# Altium PCB main.PcbDoc (part 2 of 3)
Units mm, origin at the board's own origin, x right, y up, seen from the top; angles counter-clockwise.
Board outline 200 x 85 mm, 2 copper layers (Top Layer, Bottom Layer); 362 components, 202 nets, 1059 pads, 878 vias.
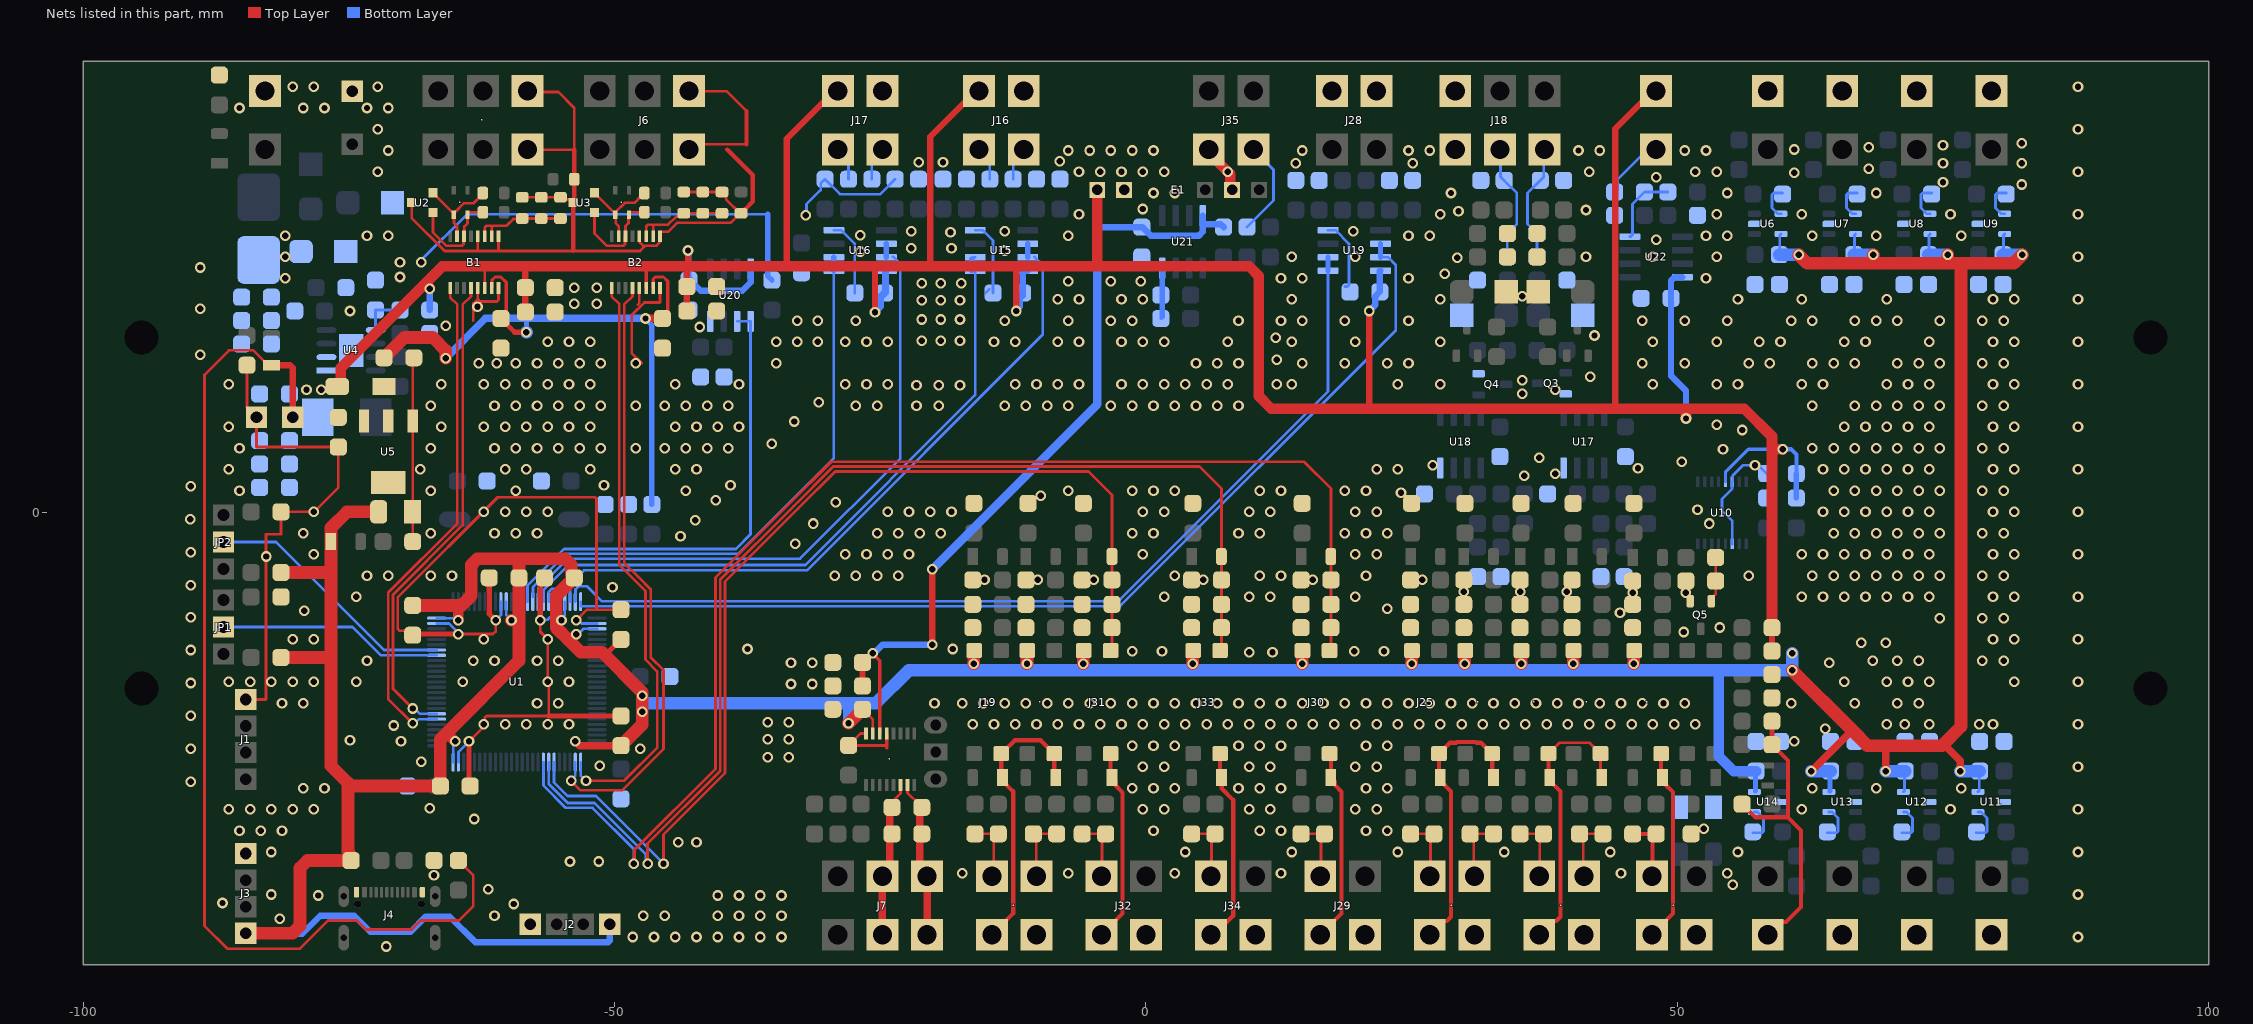
[diagram p2: the nets of this part, all layers, seen from the top]

## Part data
. . . . . . D17 D24 D26 D28: library part LED_SMD_1206_RED, "LED, SMD, 1206, RED", ASSEMBLY=ASSEMBLY, DESC=DESCRIPTION, MANF=MANF, MANF_P#=MANF_PART#, MountType=SMT, PARAM2=1.7~2.4V, PartType=LED, PRICE=36t@Javan
. D2 D3 D6 D13 D15 D18 D19 D23 D25 D27 D29 D30 D34: library part LED_SMD_1206_GRN, "LED, SMD, 1206, GREEN", ASSEMBLY=ASSEMBLY, DESC=DESCRIPTION, MANF=-, MANF_P#=-, MountType=SMT, PARAM=20mA, PARAM2=2.2V, PartType=LED, PRICE=36t@Javan
. . . . . . . . . . . . . . . . . . . . . . . . . . . . . . . . . . . . . . F1 F2 F3 F4 F5 F6 F7 F8 R1 R2 R3 R4 R5 R6 R7 R12 R13 R14 R15 R16 R17 R19 R20 R21 R22 R23 R24 R25 R26 R27 R28 R29 R32 R33 R36 R37 R40 R41 R42 R44 R45 R47 R48 R49 R50 R51 R52 R53 R54 R55 R56 R57 R58 R59 R60 R61 R63 R64 R65 R66 R71 R74 R78 R79 R80 R81 R90 R91 R94 R96 R97 R99 R100 R101 R102 R105 R106 R107 R109 R110 R111 R112 R113 R114 R115 R116 R117 R118 R119 R120 R121 R122 R123 R124 R125 R126 R127 R128 R129 R134: library part RES_SMD_1206, "RESISTOR, SMD", ASSEMBLY=ASSEMBLY, DESC=DESCRIPTION, DIST#=MOUSER, MANF=-, MANF_P#=-, PARAM="1%, 0.25W", PARAM2=-, PRICE=-
. . . . . . J19 J25 J30 J31 J33: "Optoisolator Transistor Output 5000Vrms 1 Channel 4-SMD", PACKAGE="SMD-4 Everlight Electronics Co Ltd", Check_prices=https://www.snapeda.com/parts/EL817S/Everlight+Electronics+Co+Ltd/view-part/?ref=eda, MF="Everlight Electronics", MP=EL817S, SnapEDA_Link=https://www.snapeda.com/parts/EL817S/Everlight+Electronics+Co+Ltd/view-part/?ref=snap
. . . . J16 J17 J28 J29 J32 J34 J35: "CONN, ATX POWER, 4 P", PACKAGE=ATXPWR-4pin, MANF="TE, Molex", MANF_P#="4-1775099-0, 39281043", MountType=THD, Part Type=Conn.
. . . . . . . . . . . C1 C2 C3 C4 C5 C6 C7 C8 C9 C10 C11 C12 C13 C15 C16 C17 C22 C23 C24 C29 C30 C31 C32 C33 C34 C35 C36 C37 C39 C41 C42 C43 C46 C47 C48 C49 C50 C51 C52 C53 C54 C55 C56 C57 C58 C59 C60 C61 C62 C63 C64 C65 C66 C69 C70 C72 C73 C74 C75 C76 C77 C78 C79 C80 C81 C82 C83 C84 C87 C90 C92 C93 C94 C95 C96 C97 C98 C99 C100 C101 CY1: library part CAP_SMD_MLCC_1206, "CAP, MLCC", ASSEMBLY=ASSEMBLY, MANF=-, MANF_P#=MANF_PART#, PARAM="-, -%", PARAM2=-V, PRICE="100= 1$"
. C18 C19 C20 C21 C25 C26 C27: library part CAP_SMD_MLCC_0805, "CAP, MLCC", ASSEMBLY=ASSEMBLY, MANF=-, MANF_P#=MANF_PART#, PARAM="-, -%", PARAM2=-V, PRICE="100= 1$"
. .: library part CMP-08256-000009-1, "CMC 200MA 2LN 1KOHM SMD", Case/Package=1008, Current=200mA, DC Resistance (DCR)=900mR, Max Operating Temperature=85°C, Min Operating Temperature=-40°C, Package Quantity=1, Test Frequency=100MHz, Voltage Rating=20V, DC Current=200mA, Depth=2.2mm, Height=0.051inch, Impedance=1kR, Lead Free="Lead Free", Length=0.098inch, Max DC Current=200mA, Mount="Surface Mount", Number of Lines=2, Packaging="Tape and Reel", Series=ACM, Termination=SMD/SMT, Width=0.079inch
. . . .: library part RES_SMD_0805, "RESISTOR, SMD", ASSEMBLY=ASSEMBLY, DESC=DESCRIPTION, DIST#=MOUSER, MANF=-, MANF_P#=-, PARAM=-W, PARAM2=1%, PRICE="100= 0.5$"
.: "LGA-16(4.7x5.2) Isolated RS485 Transceivers (with Power) ROHS", Manufacturer_Name=ChipAnalog, Datasheet Link=https://e.chipanalog.com/Public/Uploads/uploadfile/files/20250325/CAIS2062AdatasheetVersion1.01en20250325.pdf, Geometry.Height=1.09mm, Manufacturer_Part_Number=CA-IS2092A
. J6 J7 J18: "CONN, ATX POWER, 6 P", PACKAGE=ATXPWR-6pin, MANF=TE, MANF_P#=4-1775099-1, MountType=THD, Part Type=Conn.
.: library part DIODE_SMD_SCHOTTKY_SS34, "DIODE,TVS, 24V, 15A", ASSEMBLY=ASSEMBLY, DESC=DESCRIPTION, MANF=VISHAY, MANF_P#=SS34, PARAM=20V, PARAM2=3A, PRICE=PRICE
B1 B2: "LGA-16(4.7x5.2) Isolated CAN Transceivers (with Power) ROHS", Manufacturer_Name=ChipAnalog, Datasheet Link=https://e.chipanalog.com/Public/Uploads/uploadfile/files/20250325/CAIS2062AdatasheetVersion1.01en20250325.pdf, Geometry.Height=1.09mm, Manufacturer_Part_Number=CA-IS2062A
C28: library part CAP_THD_EL_470uF_35v, "CAP, THD, ELEC,", ASSEMBLY=ASSEMBLY, DESC=DESCRIPTION, DIST#=MOUSER, MANF=MANF, MANF_P#=MANF_PART#, PARAM=20%, PARAM2=35v, PRICE="10= -$"
C38: library part CAP_THD_EL_100uF_50v, "CAP, THD, ELEC,", ASSEMBLY=ASSEMBLY, DESC=DESCRIPTION, DIST#=MOUSER, MANF=MANF, MANF_P#=MANF_PART#, PARAM=20%, PARAM2=50v, PRICE="10= -$"
C40: library part CAP_SMD_TAN, "CAP, SMD, TAN", MANF=VISHAY, MANF_P#=T55A106M6R3C0300, PARAM="20%, 300mOhm, -55~105oC", PARAM2=6.3V, PRICE=0.46$
D1 D4 D8 D9 D10 D11: library part DIODE_SMD_SCHOTTKY_SS34, "DIODE, SCHOTTKY, 20V, 3A", ASSEMBLY=ASSEMBLY, DESC=DESCRIPTION, MANF=VISHAY, PARAM=20V, PARAM2=3A, PRICE=PRICE
  D4 D8 D9: MANF_P#=SS34
D7: library part DIODE_SMD_SCHOTTKY_B345A, "DIODE, SCHOTTKY, 40V, 3A", ASSEMBLY=ASSEMBLY, DESC=DESCRIPTION, MANF=DIODES, MANF_P#=B345AE-13, PARAM="3A, -50~150oC", PARAM2="45Vrrm, 0.45Vf", PRICE=0.35$
D31 D32: library part DIODE_SMD_1N4001, "DIODE, GENERAL PURPOSE, 50V/1A", ASSEMBLY=ASSEMBLY, DESC=DESCRIPTION, MANF=MANF, MANF_P#=1N4001, PARAM="50V VRRM", PARAM2=1A, PRICE=PRICE
E1: library part a0505s-?
FH1: library part FUSE_SMD_HOLDER_24101812, "Fuse SMD2410 Holder", PACKAGE=SMD,5.0x9.7mm, MANF=Littelfuse, MANF_P#=01550900M, PARAM="max. 10A", PARAM2=125v, PRICE=0.2$
FUSE_SMD1: library part RES_SMD_1206, "resetable fuse", ASSEMBLY=ASSEMBLY, DESC=DESCRIPTION, DIST#=MOUSER, MANF=-, MANF_P#=-, PARAM="1%, 0.25W", PARAM2=-, PRICE=-
J1 J2 J3: "PW10-x-M, JST-BxB-XH-A pitch: 2.5mm, 3A/250v", MANF=JST, MANF_P#=B4B-XH-A, PARAM=3.0A, PARAM2=250v
J4: library part CONN_USBC_SMD_16_DX07S016JA1, "CONN, USB, Type C, USB 2.0, Right-Angle, SMD", MANF=JAE, MANF_P#=DX07S016JA1R1500, PARAM=5A, PRICE=1.5$
J8 J9 J10 J11 J12 J13 J14 J15 J36 POWER1: "CONN, ATX POWER, 2 P", PACKAGE=ATXPWR-2pin, MANF=Molex, MANF_P#=39281023, MountType=THD, Part Type=Conn.
JP1 JP2 JP3: library part JUMPER_HDR_3P, "JUMPER, HEADER 3PIN", MANF=MANF, MANF_P#=MANF_P#
L3: library part AMPLA7050S-100MT, "Inductor Power Shielded/Molded Wirewound 10uH 20% 100KHz Carbonyl Powder 4A 0.069Ohm DCR T/R", PACKAGE=Package, Availability="In Stock", Check_prices=https://www.snapeda.com/parts/AMPLA7050S-100MT/Abracon/view-part/?ref=eda, MF="Abracon Corporation", MP=AMPLA7050S-100MT, PRICE=None, Purchase-URL=https://pricing.snapeda.com/search/part/AMPLA7050S-100MT/?ref=eda, SnapEDA_Link=https://www.snapeda.com/parts/AMPLA7050S-100MT/Abracon/view-part/?ref=snap
Q1 Q2 Q3 Q4: library part NPN_MMBT8050_SOT23, "BJT, NPN, 25v, 1.5A, SMD, SOT23", PACKAGE=SOT-23, MANF=GALAXY, MANF_P#=MMBT8050, PARAM="25v, 1.5A", PARAM2=300mW, PRICE=0.09t@JAVAN
Q5: library part MOSN_2N7002_SOT23, "MOSFET, N-CH, 60V, 0.3A", ASSEMBLY=ASSEMBLY, MANF=NXP, MANF_P#=2N7002, PARAM=0.3A, PARAM2=60v, PRICE=0.3t@Javan
RAMON1 RAMON2: library part RamonLogo
U1: "ARM Cortex-M4 32-bit MCU+FPU, 210 DMIPS, 1024 kB Flash, 192 kB Internal RAM, 82 I/Os, 100-pin LQFP, -40 to 85 degC, Tray", I/Os (High Current)=82, Manufacturer=STMicroelectronics, Operating Frequency(F) (Processor speed) (MHz)=168, Supplier Part Number 1=497-11605-ND, Supply Voltage(Vcc) max (V)=3.6, Supply Voltage(Vcc) min (V)=1.8, ComponentLink1Description="Manufacturer URL", ComponentLink1URL=http://www.st.com/web/en/home.html, ComponentLink2Description=Datasheet, ComponentLink2URL=http://www.st.com/st-web-ui/static/active/en/resource/technical/document/datasheet/DM00037051.pdf, ComponentLink3Description="Package Specification", ComponentLink3URL=http://www.st.com/st-web-ui/static/active/en/resource/technical/document/data_brief/DM00071938.pdf, Core="ARM Cortex-M4", D/A Converter=2x12-bit, DatasheetVersion="Rev. 4", FLASH Size (Prog) (kB)=1024, Internal RAM Size (kB)=192, Mounting Technology="Surface Mount", PackageDescription="100-Pin Low Profile Quad Flat Package, 14 x 14 mm Body, 0.5 mm Pitch", PackageReference=LQFP100, PackageVersion="Rev. 1, 06/2013", Packing=Tray, PartNumber=STM32F407VGT6, Supplier 1=Digi-Key, Supplier 2=Farnell, Supplier 3=Newark, Supplier 4=Mouser, Supplier Part Number 2=2064368, Supplier Part Number 3=73T2333, Supplier Part Number 4=511-STM32F407VGT6
U2 U3: library part CMP-2000-07553-1, "TVS Array - Asymmetrical Data Line Protector, 600 W, 7.5 V, -55 to 150 degC, 3-Pin SOT23, RoHS, Tape and Reel", Capacitance=75pF, Case\/Package=SOT-23, Clamping Voltage=17V, Current=20uA, Manufacturer="Protek Devices", Max Operating Temperature=150degC, Min Breakdown Voltage=7.5V, Min Operating Temperature=-55degC, Package Description="3-Pin Small Outline Transistor, Body 2.92 x 1.3 mm, Pitch 0.94 mm", Package Reference=SOT23-3, Power Dissipation=600W, Voltage=12V, Working Voltage=7V, Datasheet URL=www.protekdevices.com/xyz/documents/datasheets/psm712.pdf, Datasheet Version=10/2013, Depth=1.4mm, Direction=Bidirectional, Element Configuration=Dual, Lead Free=LeadFree, Leakage Current=20uA, Length=3.04mm, Manufacturer URL=http://www.protekdevices.com/, Mounting Technology=SurfaceMount, Number of Pins=3, Packaging=TapeandReel, Radiation Hardening=No, RoHSCompliant=True
U4: library part CMP-04918-000184-1, "IC REG BUCK ADJUSTABLE 3A 8SOPWR", Max Input Voltage=36V, Max Operating Temperature=125°C, Max Output Voltage=24V, Min Input Voltage=3.8V, Min Operating Temperature=-40°C, Min Output Voltage=1V, Output Current=3A, Switching Frequency=400kHz, Mount="Surface Mount", Number of Outputs=1, Number of Pins=8, Output Configuration=Positive, Output Type=Adjustable, Packaging="Cut Tape", RoHS Compliant=Yes, Synchronous Rectifier=Yes
U5: "1-A 16-V high-PSRR linear voltage regulator", PACKAGE="SOT-223-4 Texas Instruments", Check_prices=https://www.snapeda.com/parts/TLV76133DCYR/Texas+Instruments/view-part/?ref=eda, MF="Texas Instruments", MP=TLV76133DCYR, SnapEDA_Link=https://www.snapeda.com/parts/TLV76133DCYR/Texas+Instruments/view-part/?ref=snap
U6 U7 U8 U9 U11 U12 U13 U14: "26V, 350kHz current sense amplifier", PACKAGE="SOT-23-5 Texas Instruments", Check_prices=https://www.snapeda.com/parts/INA180A1IDBVR/Texas+Instruments/view-part/?ref=eda, MF="Texas Instruments", MP=INA180A1IDBVR, SnapEDA_Link=https://www.snapeda.com/parts/INA180A1IDBVR/Texas+Instruments/view-part/?ref=snap
U10: "1 Circuit IC Switch 8:1 4.5Ohm 16-TSSOP", PACKAGE="TSSOP-16 Analog Devices", Availability=Good, Check_prices=https://www.snapeda.com/parts/ADG708BRUZ-REEL7/Analog%20Devices%20Inc./view-part/1237689/?ref=eda, MF="Analog Devices", MP=ADG708BRUZ-REEL7, PRICE=None, Purchase-URL=https://pricing.snapeda.com/search/part/ADG708BRUZ-REEL7/?ref=eda, SnapEDA_Link=https://www.snapeda.com/parts/ADG708BRUZ-REEL7/Analog%20Devices%20Inc./view-part/1237689/?ref=snap
U15 U16 U19 U20 U21 U22: "Dual, 36-V, 1.2-MHz, 2-mV offset voltage operational amplifier", PACKAGE="SOIC-8 Texas Instruments", Check_prices=https://www.snapeda.com/parts/LM358BAIDR/Texas+Instruments/view-part/?ref=eda, MF="Texas Instruments", MP=LM358BAIDR, SnapEDA_Link=https://www.snapeda.com/parts/LM358BAIDR/Texas+Instruments/view-part/?ref=snap
U17 U18: library part LM358BAIDR, "Dual, 36-V, 1.2-MHz, 2-mV offset voltage operational amplifier", PACKAGE="SOIC-8 Texas Instruments", Check_prices=https://www.snapeda.com/parts/LM358BAIDR/Texas+Instruments/view-part/?ref=eda, MF="Texas Instruments", MP=LM358BAIDR, SnapEDA_Link=https://www.snapeda.com/parts/LM358BAIDR/Texas+Instruments/view-part/?ref=snap
U23: "P-Channel 100 V 600mA (Ta) 625mW (Ta) Surface Mount SOT-23-3", PACKAGE="SOT-23-3 Diodes Inc.", Availability="In Stock", Check_prices=https://www.snapeda.com/parts/ZXMP10A13FTA/Diodes+Inc./view-part/?ref=eda, MF="Diodes Inc.", MP=ZXMP10A13FTA, PRICE=None, Purchase-URL=https://pricing.snapeda.com/search/part/ZXMP10A13FTA/?ref=eda, SnapEDA_Link=https://www.snapeda.com/parts/ZXMP10A13FTA/Diodes+Inc./view-part/?ref=snap
X1: library part XTL_2_HC49_8MHz_SMD, "Crystal MOST POPULAR ABL HC49 PACKAGE", MANF=ABRACON, MANF_P#=ABLS-8.000MHZ-B4-T, PARAM="8MHz, 18pF, 30PPM, -20~70oC", PRICE=0.3$

## Free pads (board coordinates)
  round 3 hole 3.2: 3(-94.5,16.5) 3(94.5,16.5) 4(-94.5,-16.5) 4(94.5,-16.5)

## Via types
v1: diameter 1, hole 0.6, Top Layer to Bottom Layer, tented both sides, 876 vias
v2: diameter 1, hole 0.6, Top Layer to Bottom Layer, 2 vias

## Nets (pads, with @x,y where several pads share a name; then routed paths per layer and width w, separated by ;. In a path a pad name is that pad's centre, name@x,y a point inside that pad or via, vN(x,y) a via of type N, cw(c..) or ccw(c..) an arc to the next point about the centre after c; other vN are vias at no path point)
3v3MCU: ..4@30.03,-12.95 ..4@35.33,-12.95 ..4@40.23,-12.95 ..4@45.93,-12.95 ..4@-11.17,-12.95 ..7 B1.7 B2.7 C8.2 C9.2 C10.2 C11.2 C12.2 C13.2 C17.1 C24.1 C40.1 C41.1 C48.1 C49.2 C50.2 C53.2 C54.2 C58.2 C59.2 C62.2 C63.2 D6.1 D7.1 J2.1 J3.1 J19.4 J25.4 J30.4 J31.4 J33.4 R2.2 R4.2 R5.1 R6.2 U1.11 U1.19 U1.21 U1.22 U1.28 U1.50 U1.75 U1.100 U5.2 U5.4 U6.5 U7.5 U8.5 U9.5 U11.5 U12.5 U13.5 U14.5 | length 545
  Top Layer w0.254: B1.7@-61.575,21.175 B1.7@-61.553,21.197 ; C17.1@-60.7,18.3 C17.1@-60.2,18.8 ; C24.1@-45.5,18.3 C24.1@-45,18.8 ; C48.1@-26.675,-18.475 -25.7,-19.45 ..7@-25.7,-20.75
  Top Layer w0.3: B1.7@-61.553,21.197 -61.553,21.908 -61.261,22.2 -60.7,22.2 -60.2,21.7 C17.1@-60.2,18.8 ; B2.7@-46.375,21.175 -46.375,22.009 -46.184,22.2 -45.4,22.2 -45,21.8 C24.1@-45,18.8
  Top Layer w0.5: C17.1@-60.7,18.3 -59.4,17 v1(-58.3,17) ; -51.2,-13.1 -50.6,-13.1 C11.2@-49.4,-11.9 ; 66.4,-20.5 66.5,-20.5 ; 69.614,-21.986 69.7,-21.9 ; 74.9,-21.9 75.2,-21.9
  Top Layer w0.7: v1(-53.7,-21.5) -53.3,-21.9 C8.2@-49.4,-21.9 ; v1(-47.1,18.3) C24.1@-45.5,18.3 ; v1(62.6,-24.3) 66.4,-20.5 ; v1(69.614,-24.3) 69.614,-21.986 ; 75.2,-21.9 76.629,-23.329 v1(76.629,-24.3)
  Top Layer w1: -65.8,-20.7 v1(-65,-21.5) ; v1(-64.7,-10.1) -64.7,-9 -64.4,-8.7 ; -54.35,-11.95 -54.15,-11.95 v1(-53.6,-11.4)
  Top Layer w1.2: J3.1@-84.7,-39.55 -80.303,-39.55 -79.6,-38.847 -79.6,-33.403 -78.897,-32.7 R5.1@-74.8,-32.7 -75,-32.5 -75,-31.983 -75.1,-31.883 -75.1,-25.4 ; R2.2@-81.4,-13.6 -76.7,-13.6 ; R6.2@-81.4,-5.6 -76.849,-5.6 -76.7,-5.451 ; C40.1@-72.2,0.1 -75.2,0.1 -76.7,-1.4 D6.1@-76.7,-2.7 -76.7,-5.451 ; C41.1@-71.7,14.6 -69.8,16.5 -67.1,16.5 -65.9,15.3 v1(-65.9,14.558) ; C9.2@-69,-8.7 -64.4,-8.7 -63.5,-7.8 -63.5,-4.886 -62.914,-4.3 -59,-4.3 ; v1(-59.7,-10.1) -59,-10.1 ; C8.2@-49.4,-21.9 -47.4,-19.9 v1(-47.4,-18.7) v1(-47.4,-17.2) -47.4,-16.9 -51.2,-13.1 -53.2,-13.1 -54.35,-11.95 -55.5,-10.8 -55.5,-7.8 C10.2@-53.8,-6.1 -54.073,-5.827 -54.073,-4.886 -54.659,-4.3 -59,-4.3 ; v1(-28,-19.8) -26.875,-18.675 C48.1@-26.675,-18.475 ; v1(-16.2,-14.2) -16.2,-12.98 J19.4@-16.17,-12.95 ; v1(-11.2,-14.2) -11.2,-12.98 ..4@-11.17,-12.95 ; v1(-5.9,-14.2) -5.9,-12.98 J31.4@-5.87,-12.95 ; v1(4.4,-14.2) 4.4,-12.98 J33.4@4.43,-12.95 ; v1(14.7,-14.2) 14.7,-12.98 J30.4@14.73,-12.95 ; v1(25,-14.2) 25,-12.98 J25.4@25.03,-12.95 ; v1(30,-14.2) 30,-12.98 ..4@30.03,-12.95 ; v1(35.3,-14.2) 35.3,-12.98 ..4@35.33,-12.95 ; v1(40.2,-14.2) 40.2,-12.98 ..4@40.23,-12.95 ; v1(45.9,-14.2) 45.9,-12.98 ..4@45.93,-12.95 ; v1(60.8,-14.8) 66.5,-20.5 67.9,-21.9 69.7,-21.9 74.9,-21.9 76.7,-20.1 76.7,23.5 ; v1(61.414,24.3) 62.214,23.5 68.429,23.5 ; v1(68.429,24.3) 68.429,23.5 ; v1(75.443,24.3) 75.443,23.5 ; v1(82.457,24.3) 81.657,23.5 76.7,23.5 ; -76.7,-13.6 -76.7,-5.451 ; -76.7,-13.6 -76.7,-23.8 -75.1,-25.4 ; -75.1,-25.4 -74.8,-25.7 C12.2@-66.4,-25.7 -66.4,-21.3 -65.8,-20.7 -59,-13.9 -59,-10.1 ; -59,-10.1 -59,-9.4 C13.2@-59,-6.1 -59,-4.3 ; 68.429,23.5 75.443,23.5 ; 75.443,23.5 76.7,23.5
  Bottom Layer w0.254: U1.100@-66.75,-9.9 -65.102,-9.9 -64.902,-10.1 v1(-64.7,-10.1) ; U1.75@-65.2,-23.45 -65.2,-21.902 -65,-21.702 v1(-65,-21.5) ; U1.11@-60.2,-8.35 -60.2,-9.6 v1(-59.7,-10.1) ; U1.19@-56.2,-8.35 -56.191,-8.341 -56.191,-7.417 -55.898,-7.123 -55.502,-7.123 -55.209,-7.417 -55.209,-8.341 U1.21@-55.2,-8.35 -55.2,-9.698 -55,-9.898 v1@-55,-9.907 ; v1(-55,-10.1) v1@-55,-9.907 ; U1.22@-54.7,-8.35 -54.7,-9.607 v1@-55,-9.907 ; v1(-53.7,-21.5) -53.498,-21.5 -53.098,-21.9 U1.50@-51.65,-21.9 ; v1(-53.6,-11.4) -53.431,-11.4 -52.931,-10.9 U1.28@-51.65,-10.9 ; U14.5@57.245,-26.25 U14.5@57.351,-26.144 ; C63.2@57.351,-24.349 C63.2@57.4,-24.3 ; C49.2@59.6,24.3 59.649,24.349 59.649,26.144 U6.5@59.755,26.25 ; U13.5@64.259,-26.25 U13.5@64.366,-26.144 ; C62.2@64.366,-24.349 C62.2@64.414,-24.3 ; C50.2@66.614,24.3 66.663,24.349 66.663,26.144 U7.5@66.769,26.25 ; U12.5@71.274,-26.25 71.38,-26.144 C59.2@71.38,-24.349 ; C53.2@73.629,24.3 73.677,24.349 73.677,26.144 U8.5@73.784,26.25 ; U11.5@78.288,-26.25 78.394,-26.144 78.394,-24.349 C58.2@78.443,-24.3 ; C54.2@80.643,24.3 80.692,24.349 80.692,26.144 U9.5@80.798,26.25
  Bottom Layer w0.5: v1(-58.3,17) -58.3,18.3 ; v1(-47.1,18.3) -47.1,18.257 -46.5,17.657 R4.2@-46.5,0.8 ; U14.5@57.351,-26.144 C63.2@57.351,-24.349 ; U13.5@64.366,-26.144 C62.2@64.366,-24.349
  Bottom Layer w0.6: J3.1@-84.7,-39.55 -84.65,-39.6 -79.4,-39.6 -77.7,-37.9 -74.5,-37.9 -73,-39.4 -69.2,-39.4 -67.8,-38 -65.5,-38 -63.1,-40.4 -50.6,-40.4 -50.45,-40.25 J2.1@-50.45,-38.7
  Bottom Layer w0.7: v1(-65.9,14.558) -62.158,18.3 -58.3,18.3 v1@-47.154,18.3
  Bottom Layer w1: v1(-47.4,-18.7) -47.4,-17.9 v1(-47.4,-17.2) ; v1(-28,-19.8) -28,-17.9 ; 53.908,-14.8 53.908,-22.908 55.3,-24.3 C63.2@57.4,-24.3
  Bottom Layer w1.2: -47.4,-17.9 -28,-17.9 -25.4,-17.9 -22.3,-14.8 -16.2,-14.8 ; v1(-16.2,-14.2) -16.2,-14.8 ; v1(-11.2,-14.2) -11.2,-14.8 ; v1(-5.9,-14.2) -5.9,-14.8 ; v1(4.4,-14.2) 4.4,-14.8 ; v1(14.7,-14.2) 14.7,-14.8 ; v1(25,-14.2) 25,-14.65 25.15,-14.8 ; v1(30,-14.2) 30,-14.8 ; v1(35.3,-14.2) 35.3,-14.8 ; v1(40.2,-14.2) 40.2,-14.8 ; v1(45.9,-14.2) 45.9,-14.8 ; C49.2@59.6,24.3 v1(61.414,24.3) ; v1(60.8,-13.2) v1(60.8,-14.8) 53.908,-14.8 45.9,-14.8 ; v1(62.6,-24.3) C62.2@64.414,-24.3 ; C50.2@66.614,24.3 v1(68.429,24.3) ; v1(69.614,-24.3) C59.2@71.429,-24.3 ; C53.2@73.629,24.3 v1(75.443,24.3) ; v1(76.629,-24.3) C58.2@78.443,-24.3 ; C54.2@80.643,24.3 v1(82.457,24.3) ; -16.2,-14.8 -11.2,-14.8 ; -11.2,-14.8 -5.9,-14.8 ; -5.9,-14.8 4.4,-14.8 ; 4.4,-14.8 14.7,-14.8 ; 14.7,-14.8 25.15,-14.8 ; 25.15,-14.8 30,-14.8 ; 30,-14.8 35.3,-14.8 ; 35.3,-14.8 40.2,-14.8 ; 40.2,-14.8 45.9,-14.8
5vMCU: ..6@-25.05,-20.75 B1.6 B2.6 C15.2 C16.2 C22.2 C23.2 C34.1 C35.1 C36.1 C37.1 C38.1 C39.1 C46.1 C47.1 C55.2 C66.2 C69.2 C90.2 C93.2 C98.2 C100.2 D3.1 D7.2 E1.0 FUSE_SMD1.1 J16.1 J17.1 J36.1 L3.2 R15.2 R24.1 R114.2 R123.2 R124.2 U5.3 U10.13 U15.8 U16.8 U19.8 U20.8 U21.8 U22.8 | length 517.4
  Top Layer w0.251: B1.6@-62.225,21.175 -62.225,23.2
  Top Layer w0.254: D3.1@-82.3,13.9 -82.6,13.9 -84,15.3 -86.3,15.3 -88.6,13 -88.6,-38.851 -86.451,-41 -79.6,-41 -76.953,-38.353 -74.247,-38.353 -73.4,-39.2 -69.1,-39.2 -68.253,-38.353 -64.653,-38.353 -63.3,-37 -63.3,-34.1 FUSE_SMD1.1@-64.7,-32.7 ; ..6@-25.05,-20.75 ..6@-25.025,-20.725
  Top Layer w0.3: B2.6@-47.025,21.175 -47.025,23.175 -47,23.2 ; v1(-25.7,-13.2) -25.7,-13.243 -25.05,-13.893 -25.05,-20.7 ..6@-25.025,-20.725
  Top Layer w0.6: D3.1@-82.3,13.9 -80.551,13.9 -80.3,13.649 C38.1@-80.3,9 ; C16.2@-58.4,18.9 C15.2@-58.4,21.2 -58.4,23.2 ; C23.2@-43.2,19 C22.2@-43.2,21.3 -43.2,23.5 -43.1,23.6 v2(-43.1,24.7) ; -33.8,23.2 -33.8,35.2 J17.1@-29,40 ; C46.1@-26.675,-16.275 C47.1@-26.675,-14.075 -26.625,-14.075 -25.75,-13.2 v1(-25.7,-13.2) ; v1(-25.5,18.9) -25.5,23.2 ; -20.3,23.5 -20.3,35.4 J16.1@-15.7,40 ; v1(-20.1,-12.4) v1(-20.1,-5.3) ; v1(-12.2,19) -12.2,23.2 ; 21,9.9 v1(21,19) ; 44.149,10 44.149,36.149 J36.1@48,40 ; R124.2@58.9,-13 R123.2@58.9,-10.8
  Top Layer w1: D7.2@-76.1,11.9 -76.057,11.9 -75.757,12.2 -75.757,13.648 -66.204,23.2 -62.225,23.2 -58.4,23.2 -47,23.2 -33.8,23.2 -25.5,23.2 -12.2,23.2 9.7,23.2 10.6,22.3 10.6,11 11.8,9.8 50.8,9.8 ; v1@-67.465,21.165 v1@-67.389,21.165 ; -4.59,23.5 E1.0@-4.59,30.4 ; v1(50.81,8.89) 50.81,9.79 50.8,9.8 ; R123.2@58.9,-10.8 58.9,6 ; v2(59.9,6) 58.9,6 ; 50.8,9.8 56.3,9.8 58.9,7.2 58.9,6
  Bottom Layer w0.3: U10.13@54.525,2.918 54.525,3.841 56.684,6 v2(59.9,6)
  Bottom Layer w0.4: v2(59.9,6) 60.7,6 61.2,5.5 C55.2@61.2,3.7
  Bottom Layer w0.5: R24.1@61.2,1.4 C55.2@61.2,3.7
  Bottom Layer w0.6: R15.2@-67.4,19.1 v1(-67.4,21.1) ; v2(-43.1,24.7) -43.05,24.65 -43.05,21.95 C93.2@-43,21.9 C93.2@-42.9,22 ; C93.2@-42.9,21.9 -42.9,21.854 -42.446,21.4 -42.4,21.4 -41.9,20.9 -38,20.9 -37.207,21.693 U20.8@-37.207,22.97 ; v1(-25.7,-13.2) -25.592,-13.2 -24.792,-12.4 v1(-20.1,-12.4) ; v1(-12.2,19) -12.2,19.108 -11.89,19.418 -11.89,20.41 C66.2@-11.6,20.7 ; C66.2@-11.6,20.426 C66.2@-11.6,20.7 ; U15.8@-11.13,22.795 -11.6,22.795 C66.2@-11.6,20.7 ; -4.59,26.9 C98.2@-0.4,26.9 -0.349,26.9 0.451,26.1 4.989,26.1 5.34,26.451 U21.8@5.34,27.354 ; U21.8@5.34,27.97 U21.8@5.34,27.354 ; R114.2@7.3,26.9 7.02,27.18 5.514,27.18 U21.8@5.34,27.354 ; v1(21,19) 21.562,19.562 21.562,20.362 C90.2@22,20.8 22,22.795 U19.8@22.07,22.795 ; U22.8@50.47,22.195 49.751,22.195 49.4,21.844 C100.2@49.4,20.2 49.4,12.9 50.81,11.49 v1(50.81,8.89)
  Bottom Layer w0.7: v1(-25.5,18.9) -25.5,18.981 -25.019,19.462 -25.019,20.281 C69.2@-24.6,20.7 -24.515,20.785 U16.8@-24.515,22.745
  Bottom Layer w0.8: v1(-20.1,-5.3) -4.59,10.21 -4.59,26.9 E1.0@-4.59,30.4
  other v1: -79,11.6 -77.6,11.6
24V_analog_in1: U1.24 U19.1 U19.2 | length 93.5
  Bottom Layer w0.254: U1.24@-53.7,-8.35 -53.691,-8.341 -53.691,-7.191 -53.4,-6.9 -52.611,-6.9 -51.189,-8.322 -2.622,-8.322 17.13,11.43 U19.1@17.13,22.795
  Bottom Layer w0.5: U19.1@17.13,22.795 U19.2@17.13,24.065
24V_analog_in2: U1.25 U19.6 U19.7 | length 97
  Bottom Layer w0.254: U1.25@-53.2,-8.35 -53.2,-8.755 -53.179,-8.776 -2.434,-8.776 23.5,17.158 23.5,23.32 22.755,24.065 U19.7@22.07,24.065
  Bottom Layer w0.5: U19.7@22.07,24.065 U19.6@22.07,25.335
24vMCU: ..1@30.9,-39.691 ..1@41.2,-39.691 ..1@-10.3,-39.691 ..2@-79.5,24.6 C31.1 C32.1 C33.1 FH1.2 J8.1 J9.1 J10.1 J11.1 J12.1 J13.1 J14.1 J15.1 J28.1 J29.1 J32.1 J34.1 R16.1 R96.1 R120.1 R121.1 R122.1 U4.2 | length 68.4
  Top Layer w0.254: J15.1@58.5,-39.691 J15.1@59.688,-38.503
  Top Layer w0.4: R120.1@56.1,-27.4 57.343,-28.643 60.4,-28.643 ; R121.1@58.9,-21.8 60.4,-23.3 60.4,-28.643 ; J15.1@59.688,-38.503 60.232,-38.503 61.646,-37.089 61.646,-29.889 60.4,-28.643
  Top Layer w0.5: R121.1@58.9,-21.8 R122.1@58.9,-19.6
  Bottom Layer w0.254: v1@-68.2,23.8 -63.9,28.1 -35.6,28.1
  Bottom Layer w0.5: -35.6,28.1 -35.6,22.3 R96.1@-35.2,21.9
  other v1: -81,22.1 -70.2,22.2 -70.2,23.6 -68.2,23.6 -81,24.1 -81,26.1
+-4V-Battrycurrent: J35.4 R115.2 | length 9.1
  Bottom Layer w0.254: R115.2@9.5,26.9 12,29.4 12,32.291 J35.4@10.1,34.191
A: ..14 C42.2 J7.2 J7.5 R19.2 | length 14.3
  Top Layer w0.254: J7.5@-24.8,-34.191 J7.5@-24.1,-33.491 ; R19.2@-24.1,-27.4 -23.1,-26.4 ..14@-23.1,-25.6
  Top Layer w0.7: J7.2@-24.8,-40 J7.5@-24.8,-35 ; J7.5@-24.1,-33.491 R19.2@-24.1,-27.4
B: ..15 C42.1 J7.1 J7.4 R19.1 | length 14.4
  Top Layer w0.254: ..15@-22.45,-25.6 -22.435,-25.615 -22.435,-26.34 -21.375,-27.4 R19.1@-21.3,-27.4 ; J7.4@-21.3,-33.491 J7.4@-20.6,-34.191
  Top Layer w0.7: J7.4@-21.3,-33.491 R19.1@-21.3,-27.4 ; J7.1@-20.6,-40 J7.4@-20.6,-35
battryVoltage: U1.15 U20.1 U20.2 | length 45.8
  Bottom Layer w0.254: U1.15@-58.2,-8.35 -58.2,-6.842 -54.758,-3.4 -38.6,-3.4 -37.207,-2.007 U20.1@-37.207,18.03 U20.2@-38.477,18.03
Boot0: JP2.2 U1.94 | length 24.3
  Bottom Layer w0.254: JP2.2@-86.8,-2.74 -81.86,-2.74 -71.7,-12.9 U1.94@-66.75,-12.9
digital_out: Q5.1 R127.2 R128.1 | length 4.3
  Top Layer w0.254: Q5.1@53.2,-8.3 53.2,-8.024 53.6,-7.624 R127.2@53.6,-4.2
DIGITIN: ..2@45.8,-30.2 ..2@48,-30.2 ..4@47.6,-34.191 | length 7.2
  Top Layer w0.254: ..4@47.6,-35 ..4@47.663,-34.937 ; ..2@47.663,-30.537 ..2@48,-30.2
  Top Layer w0.4: ..2@45.8,-30.2 ..2@48,-30.2 ; ..4@47.663,-34.937 ..2@47.663,-30.537
DirBackward: C96.1 D27.2 J31.3 R105.2 R106.2 U1.56 | length 100.6
  Top Layer w0.254: v1(-45.4,-33) -45.4,-30.251 -39.606,-24.457 -39.606,-6.469 -32.728,0.41 -32.728,0.42 -29.24,3.908 -5.408,3.908 -3.2,1.7 D27.2@-3.2,-4.1 R105.2@-3.2,-6.3 R106.2@-3.2,-8.6 C96.1@-3.2,-10.8 -3.2,-12.82 J31.3@-3.33,-12.95
  Bottom Layer w0.254: U1.56@-55.7,-23.45 -55.7,-25.364 -54.426,-26.638 -51.762,-26.638 v1(-45.4,-33)
DirForward: C95.1 D25.2 J30.3 R100.2 R101.2 U1.58 | length 123.4
  Top Layer w0.254: v1(-48.2,-33) -48.125,-32.925 -48.125,-31.691 -40.514,-24.081 -40.514,-6.092 -33.636,0.786 -33.636,0.796 -29.616,4.816 14.884,4.816 17.4,2.3 D25.2@17.4,-4.1 R101.2@17.4,-6.3 R100.2@17.4,-8.6 C95.1@17.4,-10.8 17.4,-12.82 J30.3@17.27,-12.95
  Bottom Layer w0.254: U1.58@-56.7,-23.45 -56.7,-25.648 -54.602,-27.746 -52.084,-27.746 -48.2,-31.63 v1(-48.2,-33)
DirN: C97.1 D29.2 J33.3 R110.2 R111.2 U1.57 | length 112.2
  Top Layer w0.254: v1(-46.9,-33) -46.9,-31.109 -40.06,-24.269 -40.06,-6.281 -33.182,0.598 -33.182,0.608 -29.428,4.362 5.038,4.362 7.1,2.3 D29.2@7.1,-4.1 R110.2@7.1,-6.3 R111.2@7.1,-8.6 C97.1@7.1,-10.8 7.1,-12.82 J33.3@6.97,-12.95
  Bottom Layer w0.254: U1.57@-56.2,-23.45 -56.2,-25.506 -54.414,-27.292 -51.896,-27.292 -47.043,-32.146 -47.043,-32.857 v1(-46.9,-33)
feedback: R15.1 R17.2 U4.5 | length 4.2
  Bottom Layer w0.254: U4.5@-72.484,17.205 -72.5,17.221 R17.2@-72.5,19.1 R15.1@-70.2,19.1
GasOut1: ..1@37.1,31.3 J18.6 R48.2 R50.2 | length 11.9
  Bottom Layer w0.254: R48.2@36.8,24.1 R50.2@36.8,26.3 35.9,27.2 35.9,30.1 ..1@37.1,31.3 37.436,31.637 37.436,34.937 J18.6@37.5,35
GasOut2: ..1@33.7,31.3 J18.5 R49.2 R51.2 | length 11.9
  Bottom Layer w0.254: J18.5@33.3,35 33.363,34.937 33.363,31.637 ..1@33.7,31.3 34.9,30.1 34.9,27.2 R51.2@34,26.3 R49.2@34,24.1
GND1: ..1@38,-24.9 ..1@42.9,-24.9 ..2@37,-39.691 ..2@37.87,-22.65 ..2@42.77,-22.65 | length 27.2
  Top Layer w0.254: ..1@37.87,-24.77 ..1@38,-24.9 ; ..2@37.87,-22.65 37.9,-22.65 38.932,-21.618 41.708,-21.618 42.74,-22.65 ..2@42.77,-22.65 42.77,-24.77 ..1@42.9,-24.9 ..1@42.9,-25.2
  Top Layer w0.4: ..2@37,-40 ..2@37,-39.691 38.3,-38.391 38.609,-38.391 39,-38 39,-26.2 38.3,-25.5 38,-25.2 ..1@38,-24.9 ; ..1@37.87,-24.77 ..2@37.87,-22.65
GND2: ..1@32.7,-24.9 ..2@26.7,-39.691 ..2@32.57,-22.65 D17.1 J25.2 | length 27.3
  Top Layer w0.4: ..2@26.7,-40 ..2@26.7,-39.691 28,-38.391 28.309,-38.391 28.7,-38 28.7,-26.2 27.7,-25.2 D17.1@27.7,-24.9 27.57,-24.77 J25.2@27.57,-22.65 27.573,-22.65 28.178,-22.045 28.178,-22.042 28.602,-21.618 29.16,-21.618 29.233,-21.545 31.027,-21.545 31.1,-21.618 31.508,-21.618 32.54,-22.65 ..2@32.57,-22.65 32.57,-24.77 ..1@32.7,-24.9 ..1@32.7,-25.2
GND3: D24.1 J29.2 J30.2 | length 18.3
  Top Layer w0.4: J29.2@16.4,-39.691 18.404,-37.687 18.404,-26.233 17.773,-25.602 17.773,-25.273 D24.1@17.4,-24.9 17.4,-22.78 J30.2@17.27,-22.65
GND4: D26.1 J31.2 J32.2 | length 18.3
  Top Layer w0.4: J32.2@-4.2,-39.691 -2.2,-37.691 -2.2,-26.3 -2.9,-25.6 -2.9,-25.2 -3.33,-24.77 J31.2@-3.33,-22.65
GND5: D28.1 J33.2 J34.2 | length 18.7
  Top Layer w0.4: J34.2@6.1,-40 8.2,-37.9 8.2,-27 7.132,-25.932 7.132,-24.932 6.97,-24.77 J33.2@6.97,-22.65
GND6: ..1@-8.5,-24.9 ..1@-13.5,-24.9 ..2@-8.63,-22.65 ..2@-14.5,-39.691 J19.2 | length 27
  Top Layer w0.4: ..2@-14.5,-39.691 -12.5,-37.691 -12.5,-26.2 -13.5,-25.2 ..1@-13.5,-24.9 -13.63,-24.77 J19.2@-13.63,-22.65 ; J19.2@-13.6,-22.65 -12.35,-21.4 -9.91,-21.4 -8.66,-22.65 ..2@-8.63,-22.65 ..1@-8.63,-25.342
GND7: ..1@48.6,-24.9 ..2@47.6,-39.691 ..2@48.47,-22.65 | length 18.9
  Top Layer w0.254: ..1@48.47,-24.77 ..1@48.6,-24.9 ; ..1@48.6,-25.2 ..1@48.973,-25.573
  Top Layer w0.4: ..2@47.6,-39.691 49.6,-37.691 49.6,-26.274 48.9,-25.574 48.9,-25.2 ..1@48.6,-24.9 ; ..1@48.47,-24.77 ..2@48.47,-22.65
inputfuel: J36.2 R117.2 R119.2 | length 8.6
  Bottom Layer w0.254: R117.2@44.1,28 R119.2@44.1,30.2 44.381,30.481 44.381,31.381 J36.2@48,35
inputjoy1-1: ..1@-14.7,31.4 J16.3 | length 4
  Bottom Layer w0.254: J16.3@-15.7,35 -15.7,34.34 -14.7,33.34 ..1@-14.7,31.4
inputjoy1-2: ..1@-12.5,31.4 J16.4 | length 4
  Bottom Layer w0.254: ..1@-12.5,31.4 -12.5,33.34 -11.5,34.34 J16.4@-11.5,35
inputjoy2-1: ..1@-28,31.4 J17.3 | length 4
  Bottom Layer w0.254: J17.3@-29,35 -29,34.34 -28,33.34 ..1@-28,31.4
inputjoy2-2: ..1@-25.8,31.4 J17.4 | length 4
  Bottom Layer w0.254: ..1@-25.8,31.4 -25.8,33.34 -24.8,34.34 J17.4@-24.8,35
iso-switch-on: ..2@-13.9,-30.2 ..4@-14.5,-34.191 R63.2 | length 7.2
  Top Layer w0.254: R63.2@-16.1,-30.2 ..2@-13.9,-30.2 -14.337,-30.637 -14.337,-34.837 ..4@-14.5,-35
iso-switch-start: ..2@-8.4,-30.2 ..2@-10.6,-30.2 ..3@-10.3,-34.191 | length 7.1
  Top Layer w0.254: ..3@-10.3,-35 -10.313,-34.987 -10.313,-30.487 ..2@-10.6,-30.2 ..2@-8.4,-30.2
isoDirBackward: ..2@-3.8,-30.2 ..2@-6,-30.2 J32.4 | length 7.2
  Top Layer w0.254: ..2@-6,-30.2 ..2@-3.8,-30.2 -4.137,-30.537 -4.137,-34.937 J32.4@-4.2,-35
isoDirForward: ..2@16.8,-30.2 J29.4 R99.2 | length 7.2
  Top Layer w0.254: R99.2@14.6,-30.2 ..2@16.8,-30.2 16.463,-30.537 16.463,-34.937 J29.4@16.4,-35
isoDirN: ..2@6.5,-30.2 J34.4 R109.2 | length 7.2
  Top Layer w0.254: R109.2@4.3,-30.2 ..2@6.5,-30.2 6.163,-30.537 6.163,-34.937 J34.4@6.1,-35
ISOrpm_A: ..2@35.2,-30.2 ..2@37.4,-30.2 ..4@37,-34.191 | length 7.2
  Top Layer w0.254: ..2@35.2,-30.2 ..2@37.4,-30.2 37.063,-30.537 37.063,-34.937 ..4@37,-35
ISOrpm_B: ..2@40.8,-30.2 ..2@43,-30.2 ..3@41.2,-34.191 | length 7.2
  Top Layer w0.254: ..3@41.2,-35 41.136,-34.937 41.136,-30.536 ..2@40.8,-30.2 ..2@43,-30.2
ISOspeed_A: ..2@27.1,-30.2 ..4@26.7,-34.191 R74.2 | length 7.2
  Top Layer w0.254: R74.2@24.9,-30.2 ..2@27.1,-30.2 26.763,-30.537 26.763,-34.937 ..4@26.7,-35
ISOspeed_B: ..2@30.5,-30.2 ..2@32.7,-30.2 ..3@30.9,-34.191 | length 7.2
  Top Layer w0.254: ..3@30.9,-35 30.836,-34.937 30.836,-30.536 ..2@30.5,-30.2 ..2@32.7,-30.2
JoyFeedback1-1: U1.18 U15.1 U15.2 | length 62.5
  Bottom Layer w0.254: U1.18@-56.7,-8.35 -56.691,-8.341 -56.691,-7.259 -54.332,-4.9 -32.058,-4.9 -16.07,11.088 U15.1@-16.07,22.795 ; U15.2@-16.4,23.892 -16.227,24.065 U15.2@-16.07,24.065
  Bottom Layer w0.5: U15.1@-16.4,22.795 U15.2@-16.4,23.892
JoyFeedback1-2: U1.23 U15.6 U15.7 | length 64.8
  Bottom Layer w0.254: U1.23@-54.2,-8.35 -54.191,-8.341 -54.191,-6.691 -52.9,-5.4 -31.916,-5.4 -9.717,16.799 -9.717,23.317 U15.7@-10.5,24.1
  Bottom Layer w0.5: U15.7@-11.13,24.065 U15.6@-11.13,25.335
JoyFeedback2-1: U1.16 U16.1 U16.2 | length 53.2
  Bottom Layer w0.254: U1.16@-57.677,-7.9 -57.677,-6.961 -54.57,-3.854 -38.412,-3.854 -29.37,5.188 U16.1@-29.37,22.795
  Bottom Layer w0.5: U16.1@-29.37,22.795 U16.2@-29.37,24.065
JoyFeedback2-2: U1.17 U16.6 U16.7 | length 60.5
  Bottom Layer w0.254: U1.17@-57.177,-7.9 -57.177,-7.103 -54.382,-4.308 -32.538,-4.308 -23.118,5.112 -23.118,23.438 -23.78,24.1 U16.7@-23.8,24.1
  Bottom Layer w0.5: U16.7@-24.43,24.065 U16.6@-24.43,25.335
MCUGND: ..1@29.9,-6.3 ..1@29.9,-8.6 ..1@35.2,-6.3 ..1@35.2,-8.6 ..1@40.1,-6.3 ..1@40.1,-8.6 ..1@45.8,-6.4 ..1@45.8,-8.6 ..1@51.8,-39.691 ..1@-11.3,-6.3 ..1@-11.3,-8.6 ..1@-75.3,24.6 ..2@16.3,31.3 ..2@22.9,31.3 ..2@29.9,-10.8 ..2@35.2,-10.8 ..2@40.1,-10.8 ..2@45.8,-10.8 ..2@-10.3,31.4 ..2@-11.3,-10.8 ..2@-16.9,31.4 ..2@-23.6,31.4 ..2@-75.3,21.2 ..5@-24.4,-20.75 ..8 B1.5 B1.8 B2.5 B2.8 C1.1 C2.1 C3.1 C4.1 C5.1 C6.1 C7.1 C8.1 C9.1 C10.1 C11.1 C12.1 C13.1 C15.1 C16.1 C17.2 C22.1 C23.1 C24.2 C28.2 C29.2 C31.2 C32.2 C33.2 C34.2 C35.2 C36.2 C37.2 C38.2 C39.2 C40.2 C41.2 C46.2 C47.2 C48.2 C49.1 C50.1 C51.2 C52.2 C53.1 C54.1 C55.1 C56.2 C57.2 C58.1 C59.1 C60.2 C61.2 C62.1 C63.1 C64.2 C65.2 C66.1 C69.1 C70.2 C72.2 C73.2 C74.2 C75.2 C76.2 C77.2 C78.2 C79.2 C80.2 C81.2 C82.2 C83.2 C84.2 C87.2 C90.1 C92.2 C93.1 C94.2 C95.2 C96.2 C97.2 C98.1 C99.1 C100.1 C101.2 CY1.2 D4.1 D8.1 D9.1 D10.1 D11.1 D31.1 D32.1 E1.1 E1.3 J1.4 J2.4 J3.4 J4.A1B12 J4.B1A12 J16.2 J17.2 J18.1 J18.4 J28.2 J35.3 POWER1.1 Q3.2 Q4.2 Q5.2 R1.2 R3.2 R7.2 R12.1 R13.1 R14.1 R17.1 R20.2 R21.2 R22.2 R23.2 R25.2 R26.2 R27.2 R28.2 R29.2 R32.2 R33.2 R36.2 R37.2 R40.2 R41.2 R60.2 R61.2 R64.1 R65.1 R66.1 R71.1 R78.1 R79.1 R80.1 R81.1 R90.1 R91.1 R94.2 R97.2 R100.1 R101.1 R102.1 R105.1 R106.1 R107.1 R110.1 R111.1 R112.1 R116.1 R118.1 R119.1 R125.2 R126.2 R128.2 R129.2 R134.1 U1.10 U1.20 U1.27 U1.74 U1.99 U4.1 U4.9 U5.1 U6.2 U6.4 U7.2 U7.4 U8.2 U8.4 U9.2 U9.4 U10.3 U10.14 U11.2 U11.4 U12.2 U12.4 U13.2 U13.4 U14.2 U14.4 U15.4 U16.4 U17.4 U18.4 U19.4 U20.4 U21.4 U22.4 | length 278.6
  Top Layer w0.254: J1.4@-84.7,-17.55 -82.8,-17.55 -82.8,-2 -81.4,-2 R7.2@-81.4,0.1 -78.3,0.1 -76,2.4 C39.2@-76,6.2 -83.7,6.2 C38.2@-83.7,9 -84.6,9.9 R13.1@-84.6,13.9 ; R14.1@-69,-2.7 C40.2@-69,0.1 U5.1@-68.999,8.649 -68.999,14.6 C41.2@-68.9,14.6 ; C9.1@-68.9,-11.4 C9.1@-69,-11.5 -69.418,-11.082 -70.251,-11.082 -70.4,-10.933 -70.4,-7.922 -61,1.478 -51.849,1.478 -51.7,1.33 -51.7,-9.1 ; v1@-64.75,-11.35 v1(-64.7,-11.4) -61.449,-11.4 -61.2,-11.151 v1(-61.2,-10.1) ; C12.1@-63.7,-25.6 C12.1@-63.6,-25.7 ; v1(-63.7,-21.5) -62.213,-20.013 -62.213,-19.249 -62.064,-19.1 -56.2,-19.1 -56.2,-15.9 -56.3,-15.8 v1(-56.3,-11.9) -56.3,-11.878 -57,-11.178 v1(-57,-10.1) ; -63.3,18.1 -63.3,19.699 -62.875,20.124 ; B1.5@-62.875,21.175 -62.875,20.124 ; B1.8@-60.925,21.175 -60.925,20.049 -61.074,19.9 -62.651,19.9 -62.875,20.124 ; C10.1@-56.6,-6.1 C10.1@-56.2,-6.5 ; v1(-53.6,-10.1) -52.6,-9.1 -51.7,-9.1 ; C11.1@-49.4,-9.1 -51.7,-9.1 ; -47.8,19.6 -47.675,19.725 B2.5@-47.675,21.175 ; -47.45,14.1 -48.4,15.05 -48.4,18.6 -47.2,19.8 -45.725,19.8 B2.8@-45.725,21.175 ; ..8@-26.35,-20.75 -26.85,-20.75 CY1.2@-27.975,-21.875 -24.549,-21.875
  Top Layer w0.3: -24.4,-22.1 ..5@-24.4,-20.75
  Top Layer w0.4: C13.1@-61.8,-6.208 C13.1@-61.8,-6.1 ; C10.1@-56.7,-6.5 C10.1@-56.2,-6.5
  Top Layer w0.5: C9.1@-68.9,-11.4 v1(-64.7,-11.4) ; C12.1@-63.7,-25.6 v1(-63.7,-21.5) ; C13.1@-61.8,-6.208 -61.8,-9.5 v1(-61.2,-10.1) ; v1(-57,-10.1) -57,-6.5 C10.1@-56.6,-6.1 ; -56.2,-19.1 C8.1@-49.4,-19.1
  Top Layer w1: J35.3@5.9,34.191 6.9,33.191 6.9,32.9 v1(7.7,32.1) 7.945,31.856 7.945,30.565 E1.3@8.11,30.4
  Bottom Layer w0.254: U1.99@-66.75,-10.4 -65.6,-10.4 -64.7,-11.3 v1(-64.7,-11.4) ; U1.74@-64.7,-23.45 -64.691,-23.441 -64.691,-22.491 v1(-63.7,-21.5) ; v1(-61.2,-10.1) -60.7,-9.6 U1.10@-60.7,-8.35 ; v1(-57,-10.1) -56.953,-10.053 -56.309,-10.053 -55.7,-9.445 U1.20@-55.7,-8.35 ; v1(-53.6,-10.1) -53.398,-10.1 -53.098,-10.4 U1.27@-51.65,-10.4 ; v1(-32,28) -31.946,28.054 -31.946,29.054 -30.608,30.392 -30.608,30.992 R36.2@-30.2,31.4 -28.8,30 -25,30 ..2@-23.6,31.4 ; U16.4@-29.37,26.605 -28.685,26.605 -27.4,25.32 C69.1@-27.4,20.7 ; U15.4@-16.07,26.605 -15.385,26.605 -14.4,25.62 C66.1@-14.4,20.7 ; C66.1@-15.1,20.7 C66.1@-14.758,21.042 ; C99.1@1.4,18.3 C99.1@1.53,18.43 ; U19.4@17.13,26.605 17.815,26.605 19.1,25.32 19.1,21.452 18.948,21.3 C90.1@18.7,21.3 ; U22.4@45.53,26.005 45.6,26.005 45.773,26.178 45.773,29.073 R119.1@46.9,30.2 C101.2@49.1,30.2 ; U10.3@55.175,-2.918 55.175,-0.779 54.2,0.196 54.2,1.3 55.15,2.25 55.15,2.892 55.2,2.943 55.2,3.5 56.2,4.5 57.6,4.5 C55.1@58.4,3.7 ; R29.2@57.1,-30.1 57.951,-30.1 58.1,-29.951 58.1,-28.7 57.55,-28.15 U14.4@57.245,-28.15 ; U6.4@59.755,28.15 59.45,28.15 58.9,28.7 58.9,29.951 59.049,30.1 R20.2@59.9,30.1 ; R28.2@64.114,-30.1 64.966,-30.1 65.114,-29.951 65.114,-28.7 64.564,-28.15 U13.4@64.259,-28.15 ; U7.4@66.769,28.15 66.464,28.15 65.914,28.7 65.914,29.951 66.063,30.1 R21.2@66.914,30.1 ; R26.2@71.129,-30.1 71.98,-30.1 72.129,-29.951 72.129,-28.7 71.579,-28.15 U12.4@71.274,-28.15 ; U8.4@73.784,28.15 73.479,28.15 72.929,28.7 72.929,29.951 73.077,30.1 R22.2@73.929,30.1 ; R25.2@78.143,-30.1 78.994,-30.1 79.143,-29.951 79.143,-28.7 78.593,-28.15 U11.4@78.288,-28.15 ; U9.4@80.798,28.15 80.493,28.15 79.943,28.7 79.943,29.951 80.092,30.1 R23.2@80.943,30.1
  Bottom Layer w0.5: C99.1@1.53,18.43 U21.4@1.53,22.96
  other v1: -71.5,-40.8 -48.3,-39.9 -46.3,-39.9 -44.3,-39.9 -42.3,-39.9 -40.3,-39.9 -38.3,-39.9 -36.3,-39.9 -34.3,-39.9 87.7,-39.9 -81.5,-38.2 -61.3,-37.9 -47.3,-37.9 -45.3,-37.9 -40.3,-37.9 -38.3,-37.9 -36.3,-37.9 -34.3,-37.9 -59.5,-36.8 -86.9,-36.7 -77.9,-36 -40.3,-36 -38.3,-36 -36.3,-36 -34.3,-36 -82.3,-35.9 87.7,-35.9 -61.9,-35.4 55.2,-35 -67,-34.1 -17.3,-33.9 -7.3,-33.9 2.7,-33.9 12.7,-33.9 44.7,-33.9 54.7,-33.9 -54.2,-32.8 -51.5,-32.8 -82.3,-31.9 3.7,-31.9 13.7,-31.9 23.7,-31.9 33.7,-31.9 43.7,-31.9 55.7,-31.9 87.7,-31.9 -44,-31 -42.3,-31 -85.3,-29.9 -83.3,-29.9 -81.3,-29.9 0.7,-29.9 10.7,-29.9 12.7,-29.9 20.7,-29.9 22.7,-29.9 52.5,-29.7 -63.2,-28.8 -86.3,-27.9 -84.3,-27.9 -82.3,-27.9 -80.3,-27.9 -78.3,-27.9 -0.3,-27.9 1.7,-27.9 9.7,-27.9 11.7,-27.9 19.7,-27.9 21.7,-27.9 61.7,-27.9 75.7,-27.9 87.7,-27.9 -67.4,-27.8 -79.3,-25.9 -77.3,-25.9 -1.3,-25.9 0.7,-25.9 2.7,-25.9 8.7,-25.9 10.7,-25.9 12.7,-25.9 20.7,-25.9 22.7,-25.9 62.7,-25.9 68.7,-25.9 76.7,-25.9 -89.9,-25.3 -0.3,-23.9 1.7,-23.9 9.7,-23.9 11.7,-23.9 19.7,-23.9 21.7,-23.9 87.7,-23.9 -51.4,-23.8 -68.2,-23.4 -35.6,-23 -33.6,-23 -89.9,-22.2 -47.6,-22.2 -1.3,-21.9 0.7,-21.9 2.7,-21.9 8.7,-21.9 10.7,-21.9 12.7,-21.9 20.7,-21.9 22.7,-21.9 -70.1,-21.5 61,-21.5 -74.9,-21.4 -35.6,-21.3 -33.6,-21.3 63.9,-20.3 -70.8,-20 -62.3,-19.9 -60.3,-19.9 -58.3,-19.9 -56.3,-19.9 -54.3,-19.9 -16.3,-19.9 -14.3,-19.9 -12.3,-19.9 -10.3,-19.9 -8.3,-19.9 -6.3,-19.9 -4.3,-19.9 -2.3,-19.9 -0.3,-19.9 1.7,-19.9 3.7,-19.9 5.7,-19.9 7.7,-19.9 9.7,-19.9 11.7,-19.9 13.7,-19.9 15.7,-19.9 17.7,-19.9 19.7,-19.9 21.7,-19.9 23.7,-19.9 25.7,-19.9 27.7,-19.9 29.7,-19.9 31.7,-19.9 33.7,-19.9 35.7,-19.9 37.7,-19.9 39.7,-19.9 41.7,-19.9 43.7,-19.9 45.7,-19.9 47.7,-19.9 49.7,-19.9 51.7,-19.9 69.7,-19.9 71.4,-19.9 73.7,-19.9 78.4,-19.9 79.7,-19.9 87.7,-19.9 -35.6,-19.7 -33.6,-19.7 -89.9,-19.1 -81.3,-17.9 -79.3,-17.9 -57.3,-17.9 -55.3,-17.9 -19.9,-17.9 -17.3,-17.9 -15.3,-17.9 -13.3,-17.9 -11.3,-17.9 -9.3,-17.9 -7.3,-17.9 -5.3,-17.9 -3.3,-17.9 -1.3,-17.9 0.7,-17.9 2.7,-17.9 4.7,-17.9 6.7,-17.9 8.7,-17.9 10.7,-17.9 12.7,-17.9 14.7,-17.9 16.7,-17.9 18.7,-17.9 20.7,-17.9 22.7,-17.9 24.7,-17.9 26.7,-17.9 28.7,-17.9 30.7,-17.9 32.7,-17.9 34.7,-17.9 36.7,-17.9 38.7,-17.9 40.7,-17.9 42.7,-17.9 44.7,-17.9 46.7,-17.9 48.7,-17.9 50.7,-17.9 60.7,-17.9 66.7,-17.9 70.7,-17.9 72.7,-17.9 -33.4,-16.1 -31.4,-16.1 -89.9,-16 -86.3,-15.9 -84.3,-15.9 -82.3,-15.9 -80.3,-15.9 -78.3,-15.9 -74.3,-15.9 -64.3,-15.9 -56.3,-15.9 -54.3,-15.9 65.7,-15.9 69.7,-15.9 71.7,-15.9 73.7,-15.9 81.7,-15.9 87.7,-15.9 -33.4,-14.1 -31.4,-14.1 64.3,-14.1 -73.3,-13.9 -63.3,-13.9 -61.3,-13.9 -57.3,-13.9 -55.3,-13.9 68.4,-13.9 70.7,-13.9 72.7,-13.9 78.7,-13.9 80.7,-13.9 9.7,-13.1 11.9,-13.1 -1.3,-13 1.5,-13 19.6,-13 22.4,-13 -89.9,-12.9 -37.5,-12.8 -18.2,-12.8 67.3,-12.2 69.6,-12.2 -80.3,-11.9 -78.3,-11.9 -62.3,-11.9 79.7,-11.9 81.7,-11.9 87.7,-11.9 50.6,-11.2 53.991,-10.785 74.7,-9.9 78.7,-9.9 80.7,-9.9 -89.9,-9.8 44.6,-9.4 -79.2,-9.2 22.7,-9 -74.3,-7.9 1.7,-7.9 9.7,-7.9 11.7,-7.9 19.7,-7.9 61.7,-7.9 63.7,-7.9 65.7,-7.9 67.7,-7.9 69.7,-7.9 71.7,-7.9 73.7,-7.9 79.7,-7.9 81.7,-7.9 87.7,-7.9 45.8,-7.5 50.8,-7.5 29.9,-7.4 35.2,-7.4 39.6,-7.4 -50.2,-7 -89.9,-6.8 -15.2,-6.3 -10.2,-6.3 -4.9,-6.3 5.4,-6.3 15.7,-6.3 26,-6.3 -73.3,-5.9 -71.3,-5.9 -67.3,-5.9 -65.3,-5.9 -29.3,-5.9 -27.3,-5.9 -25.3,-5.9 -23.3,-5.9 2.7,-5.9 10.7,-5.9 12.7,-5.9 20.7,-5.9 56.7,-5.9 62.7,-5.9 64.7,-5.9 66.7,-5.9 68.7,-5.9 70.7,-5.9 72.7,-5.9 74.7,-5.9 78.7,-5.9 80.7,-5.9 -82.8,-4.1 -78.3,-3.9 -28.3,-3.9 -26.3,-3.9 -24.3,-3.9 -22.3,-3.9 -0.3,-3.9 19.7,-3.9 21.7,-3.9 61.7,-3.9 63.7,-3.9 65.7,-3.9 67.7,-3.9 69.7,-3.9 71.7,-3.9 73.7,-3.9 79.7,-3.9 81.7,-3.9 87.7,-3.9 -89.9,-3.7 -33,-2.9 -43.8,-2.2 -79.3,-1.9 -67.3,-1.9 -61.3,-1.9 -59.3,-1.9 -57.3,-1.9 -25.3,-1.9 -23.3,-1.9 -21.3,-1.9 -19.3,-1.9 -1.3,-1.9 0.7,-1.9 8.7,-1.9 10.7,-1.9 18.7,-1.9 20.7,-1.9 22.7,-1.9 64.7,-1.9 66.7,-1.9 68.7,-1.9 70.7,-1.9 72.7,-1.9 74.7,-1.9 78.7,-1.9 80.7,-1.9 -31.3,-1 53,-1 -42.4,-0.7 -89.936,-0.609 -78.3,0.1 -62.3,0.1 -60.3,0.1 -58.3,0.1 -56.3,0.1 -24.3,0.1 -22.3,0.1 -20.3,0.1 -18.3,0.1 -0.3,0.1 1.7,0.1 9.7,0.1 11.7,0.1 19.7,0.1 21.7,0.1 63.7,0.1 65.7,0.1 67.7,0.1 69.7,0.1 71.7,0.1 73.7,0.1 79.7,0.1 81.7,0.1 87.7,0.1 51.9,0.3 -29.2,1 -40.5,1.2 -9.9,1.6 24,1.9 -85.3,2.1 -67.3,2.1 -59.3,2.1 -43.3,2.1 -7.3,2.1 -1.3,2.1 0.7,2.1 2.7,2.1 10.7,2.1 12.7,2.1 18.7,2.1 20.7,2.1 64.7,2.1 66.7,2.1 68.7,2.1 70.7,2.1 72.7,2.1 74.7,2.1 78.7,2.1 80.7,2.1 -89.9,2.5 -51,2.6 -39.1,2.6 35.6,3.5 38.5,3.7 -86.3,4.1 -68.3,4.1 -60.3,4.1 -58.3,4.1 -52.3,4.1 -44.3,4.1 -42.3,4.1 21.7,4.1 23.7,4.1 63.7,4.1 65.7,4.1 67.7,4.1 69.7,4.1 71.7,4.1 73.7,4.1 79.7,4.1 81.7,4.1 87.7,4.1 46.3,4.2 27,4.5 57.3,4.5 50.4,4.8 37,5.2 54.3,6 -85.3,6.1 -67.3,6.1 -61.3,6.1 -59.3,6.1 -57.3,6.1 -55.3,6.1 -53.3,6.1 -51.3,6.1 -48,6.1 -45.3,6.1 -43.3,6.1 -41.3,6.1 -39.3,6.1 62.7,6.1 64.7,6.1 66.7,6.1 68.7,6.1 70.7,6.1 72.7,6.1 74.7,6.1 78.7,6.1 80.7,6.1 -35.2,6.5 56.1,7.8 -86.3,8.1 -66.3,8.1 -62.3,8.1 -60.3,8.1 -58.3,8.1 -56.3,8.1 -54.3,8.1 -52.3,8.1 -44.3,8.1 -42.3,8.1 -40.3,8.1 -38.3,8.1 65.7,8.1 67.7,8.1 69.7,8.1 71.7,8.1 73.7,8.1 79.7,8.1 81.7,8.1 87.7,8.1 53.7,8.3 -33.1,8.6 -67.3,10.1 -61.3,10.1 -59.3,10.1 -57.3,10.1 -55.3,10.1 -53.3,10.1 -51.3,10.1 -48,10.1 -45.3,10.1 -43.3,10.1 -41.3,10.1 -39.3,10.1 -27.3,10.1 -25.3,10.1 -21.6,10.1 -19.5,10.1 -13.3,10.1 -11.3,10.1 -9.3,10.1 -7.3,10.1 -3.3,10.1 -1.3,10.1 0.7,10.1 2.7,10.1 4.7,10.1 6.7,10.1 8.7,10.1 62.7,10.1 66.7,10.1 68.7,10.1 70.7,10.1 72.7,10.1 74.7,10.1 78.7,10.1 80.7,10.1 -30.8,10.4 35.4,11.2 38.5,11.6 -21.6,12 -19.5,12 -17.5,12 -86.3,12.1 -66.3,12.1 -62.3,12.1 -60.3,12.1 -58.3,12.1 -56.3,12.1 -54.3,12.1 -52.3,12.1 -44.3,12.1 -38.3,12.1 -28.3,12.1 -26.3,12.1 -24.3,12.1 -12.3,12.1 -10.3,12.1 -8.3,12.1 -6.3,12.1 -2.3,12.1 -0.3,12.1 1.7,12.1 3.7,12.1 5.7,12.1 7.7,12.1 12.3,12.1 13.7,12.1 23.7,12.1 27.7,12.1 47.7,12.1 53.7,12.1 55.7,12.1 61.7,12.1 63.7,12.1 69.7,12.1 71.7,12.1 73.7,12.1 79.7,12.1 81.7,12.1 87.7,12.1 35.4,12.5 41.8,12.8 -62.8,14.1 -61.1,14.1 -59.3,14.1 -57.3,14.1 -55.3,14.1 -53.3,14.1 -51.3,14.1 -48,14.1 -34.8,14.1 4.7,14.1 6.7,14.1 8.7,14.1 14.7,14.1 18.7,14.1 22.7,14.1 24.7,14.1 46.7,14.1 50.7,14.1 56.7,14.1 58.7,14.1 62.7,14.1 64.7,14.1 66.7,14.1 70.7,14.1 72.7,14.1 74.7,14.1 78.7,14.1 80.7,14.1 12.3,14.4 -89,14.9 -56.3,16.1 -54.3,16.1 -52.3,16.1 -34.8,16.1 -32.8,16.1 -30.9,16.1 -28.3,16.1 -26.3,16.1 -24.3,16.1 -14.3,16.1 -12.3,16.1 -8.3,16.1 -6.3,16.1 -2.3,16.1 -0.3,16.1 1.7,16.1 7.7,16.1 13.7,16.1 19.7,16.1 27.7,16.1 47.7,16.1 53.7,16.1 57.7,16.1 59.7,16.1 65.7,16.1 67.7,16.1 73.7,16.1 79.7,16.1 81.7,16.1 87.7,16.1 -21.1,16.2 -19.3,16.2 -17.5,16.2 12.2,16.5 42.2,16.7 -42,17.5 -65.9,17.6 -32.8,18.1 -30.9,18.1 -27.3,18.1 -13.3,18.1 -7.3,18.1 -3.3,18.1 -1.3,18.1 8.7,18.1 12.7,18.1 14.7,18.1 18.7,18.1 24.7,18.1 46.7,18.1 50.7,18.1 54.7,18.1 60.7,18.1 62.7,18.1 66.7,18.1 68.7,18.1 70.7,18.1 74.7,18.1 78.7,18.1 80.7,18.1 -21.1,18.2 -19.3,18.2 -17.5,18.2 -74.9,19 -89,19.2 -62.9,19.4 -53.8,19.7 -51.7,19.7 -21.1,20 -19.3,20 -17.5,20 -8.3,20.1 -6.3,20.1 -2.3,20.1 -0.3,20.1 13.7,20.1 27.7,20.1 55.7,20.1 61.7,20.1 69.7,20.1 79.7,20.1 81.7,20.1 87.7,20.1 35.4,20.4 -53.8,21.2 -51.7,21.2 -21.1,21.6 -19.3,21.6 -17.4,21.6 -7.3,21.8 -3.3,21.8 -0.5,21.8 12.7,22.1 14.7,22.1 24.7,22.1 52.7,22.1 28.1,22.5 -89,23.1 29.3,24 13.7,24.1 19.7,24.1 41.4,24.1 47.7,24.1 53.7,24.1 87.7,24.1 -26.9,24.6 -13.3,24.7 -22.1,24.9 -18.3,24.9 48,25.7 -73.3,26.1 -71.3,26.1 -7.3,26.1 24.7,26.1 26.7,26.1 52.7,26.1 54.7,26.1 62.7,26.1 68.7,26.1 76.7,26.1 -26.882,26.13 -18.4,26.4 -22.1,26.5 -13.3,26.5 19.5,26.5 -6.3,28.1 27.7,28.1 53.7,28.1 61.7,28.1 75.7,28.1 87.7,28.1 29.4,28.4 41.4,28.5 -0.3,28.6 0.7,30.1 2.7,30.1 28.7,30.1 54.7,30.1 68.7,30.1 82.4,30.9 75,31.1 48,31.6 61,32 -72.3,32.1 -6.3,32.1 -4.3,32.1 -2.3,32.1 -0.3,32.1 1.7,32.1 41.7,32.1 51.7,32.1 53.7,32.1 87.7,32.1 68,32.4 14.1,32.9 25.1,32.9 75,32.9 82.4,32.9 -21.4,33 -19.1,33 -8.1,33.1 -71.3,34.1 -7.3,34.1 -5.3,34.1 -3.3,34.1 -1.3,34.1 0.7,34.1 14.7,34.1 24.7,34.1 26.7,34.1 40.7,34.1 42.7,34.1 50.7,34.1 52.7,34.1 61,34.2 68,34.4 75,34.6 82.4,34.8 -72.3,36.1 87.7,36.1 -85.3,38.1 -79.3,38.1 -77.3,38.1 -73.3,38.1 -71.3,38.1 -80.3,40.1 -78.3,40.1 -72.3,40.1 87.7,40.1
MGND: ..2@-53.8,31.4 ..3@-58.2,39.691 ..6@-58.2,34.191 B1.9 B1.12 B2.9 B2.12 C18.1 C19.1 C20.1 C21.2 C25.1 C26.1 C27.1 J6.3 J6.6 U2.3 U3.3 | length 98
  Top Layer w0.254: U2.3@-69.1,29.2 -69.1,27.758 -65.988,24.646 -60.925,24.646 B1.9@-60.925,26.025 ; -62.875,24.7 B1.12@-62.875,26.025 ; ..6@-58.725,33.175 -58.725,34.166 -58.2,34.691 -57.675,34.166 -53.8,34.166 -53.8,38.1 -55.3,39.6 -58.109,39.6 ..3@-58.2,39.691 ; C20.1@-58.7,29.7 C18.1@-56.9,29.7 C19.1@-55.1,29.7 -54.893,29.493 -54.193,29.493 U3.3@-53.9,29.2 U3.3@-53.8,29.3 ; B2.12@-47.675,26.025 -47.627,25.977 -47.627,25.44 -47.335,25.148 -47.1,25.148 ; -47.602,24.646 -47.1,25.148 ; C27.1@-43.5,30.2 C25.1@-41.7,30.2 C26.1@-39.9,30.2 ; J6.6@-43,34.691 -37.6,34.691 ; J6.3@-43,39.691 -39.464,39.691 -37.6,37.827 ; C26.1@-39.867,30.2 -39.503,29.836 -39.503,29.503 -38.2,28.2 -39.1,27.3 -44.142,27.3 -44.994,26.448 -45.677,26.448 -45.773,26.352 -45.773,25.44 -46.065,25.148 -47.1,25.148
  Top Layer w0.3: -60.925,24.646 -53.9,24.646 -47.602,24.646
  Top Layer w0.4: -53.9,24.646 U3.3@-53.9,29.2 ; U3.3@-53.8,29.3 ..2@-53.8,31.4 -53.8,34.166 ; -39.4,34.2 -37,31.8 -37,29.3 -37.731,28.569 -37.731,28.496 -38.027,28.2 C21.2@-38.1,28.2 ; -37.6,34.691 -37.6,37.827
MODE: JP1.2 U1.93 | length 21.2
  Bottom Layer w0.254: JP1.2@-86.8,-10.74 -74.66,-10.74 -72,-13.4 U1.93@-66.75,-13.4
NetB1_1: B1.1 U1.81 | length 47.3
  Top Layer w0.254: v1(-69,-19.8) -71.308,-17.492 -71.308,-7.508 -64.8,-1 -64.8,19.6 -65.475,20.275 B1.1@-65.475,21.175
  Bottom Layer w0.254: v1(-69,-19.8) -68.798,-19.8 -68.398,-19.4 U1.81@-66.75,-19.4
NetB1_4: B1.4 U1.82 | length 45.8
  Top Layer w0.254: v1(-69,-18.4) -70.854,-16.546 -70.854,-7.696 -64.3,-1.142 -64.3,19.6 -63.525,20.375 B1.4@-63.525,21.175
  Bottom Layer w0.254: v1(-69,-18.4) -68.798,-18.4 -68.298,-18.9 U1.82@-66.75,-18.9
NetB1_10: B1.10 B1.11 C18.2 C19.2 C20.2 | length 9.4
  Top Layer w0.254: B1.11@-62.225,26.025 -62.225,26.851 -62.051,27.025 -61.426,27.025 ; B1.10@-61.575,26.025 -61.575,26.876 -61.426,27.025 ; C19.2@-55.1,27.7 C18.2@-56.9,27.7 C20.2@-58.7,27.7 -58.732,27.668 -59.532,27.668 -60.175,27.025 -61.426,27.025
NetB1_14: ..1@-62.4,28.3 ..2@-63.85,28.05 B1.14 U2.1 | length 9.9
  Top Layer w0.254: U2.1@-67.1,28.26 -67.1,26.4 -65.848,25.148 -64.372,25.148 -64.223,25.297 -64.223,25.977 -64.145,26.055 -64.145,26.956 -63.85,27.251 ..2@-63.85,28.05 -63.85,28.227 -63.777,28.3 ..1@-62.4,28.3
NetB1_15: ..1@-65.15,28.05 ..2@-62.4,30.1 B1.15 U2.2 | length 8.7
  Top Layer w0.254: U2.2@-67.1,30.14 -67.1,30.11 -65.313,28.323 -65.223,28.323 -65.15,28.25 ..1@-65.15,28.05 -65.107,28.007 -65.107,27.269 -64.825,26.986 B1.15@-64.825,26.025 ; ..1@-65.077,28.245 -65.077,28.323 -64.999,28.323 -64.177,29.144 -63.256,29.144 -62.4,30 ..2@-62.4,30.1
NetB2_1: B2.1 U1.51 | length 55
  Top Layer w0.254: v1(-52.7,-25.2) -49.1,-25.2 -46,-22.1 -46,-14.9 -47.1,-13.8 -47.1,-7.342 -49.554,-4.888 -49.554,19.654 -50.275,20.375 B2.1@-50.275,21.175
  Bottom Layer w0.254: U1.51@-53.2,-23.45 -53.2,-24.707 -52.707,-25.2 v1(-52.7,-25.2)
NetB2_4: B2.4 U1.52 | length 57.8
  Top Layer w0.254: v1(-54.1,-25.2) -54.1,-25.206 -53.206,-26.1 -49.3,-26.1 -45.4,-22.2 -45.4,-14.8 -46.6,-13.6 -46.6,-7.2 -47.819,-5.981 -49.1,-4.7 -49.1,19.6 -48.325,20.375 B2.4@-48.325,21.175
  Bottom Layer w0.254: v1(-54.1,-25.2) -54.1,-25.107 -53.7,-24.707 U1.52@-53.7,-23.45
NetB2_10: B2.10 B2.11 C25.2 C26.2 C27.2 | length 9.7
  Top Layer w0.254: B2.11@-47.025,26.025 -47.025,26.975 -46.875,27.125 -46.375,27.125 ; B2.10@-46.375,26.025 -46.375,27.125 ; C26.2@-39.9,28.2 C27.2@-43.5,28.2 -43.797,27.903 -44.181,27.903 -44.959,27.125 -46.375,27.125
NetB2_14: ..1@-47.2,28.3 ..2@-48.65,28.05 B2.14 U3.1 | length 9.9
  Top Layer w0.254: U3.1@-51.9,28.26 -51.9,26.3 -50.748,25.148 -49.172,25.148 -49.023,25.297 -49.023,25.977 B2.14@-48.975,26.025 -48.975,26.986 -48.692,27.269 -48.692,28.008 ..2@-48.65,28.05 -48.65,28.227 -48.577,28.3 ..1@-47.2,28.3
NetB2_15: ..1@-49.95,28.05 ..2@-47.2,30.1 B2.15 U3.2 | length 8.6
  Top Layer w0.254: U3.2@-51.9,30.14 -51.9,30.11 -50.113,28.323 -50.023,28.323 ..1@-49.95,28.25 ; B2.15@-49.625,26.025 -49.625,26.986 -49.907,27.269 -49.907,28.007 ..1@-49.95,28.05 ..1@-49.95,28.25 ; ..2@-47.2,30.1 -47.2,30.067 -47.564,29.703 -47.597,29.703 -48.1,29.2 -49,29.2 ..1@-49.95,28.25